# Altium PCB CH32H417QEU-R1.PcbDoc (part 6 of 6)
Units mil, origin at the board's own origin, x right, y up, seen from the top; angles counter-clockwise.
Board outline 4921.26 x 3346.46 mil, 4 copper layers (Top Layer, Layer 1, Layer 2, Bottom Layer), stack 23.756 mil thick; 271 components, 257 nets, 1065 pads, 927 vias.
Unrouted connection lines stored in the file: 149.
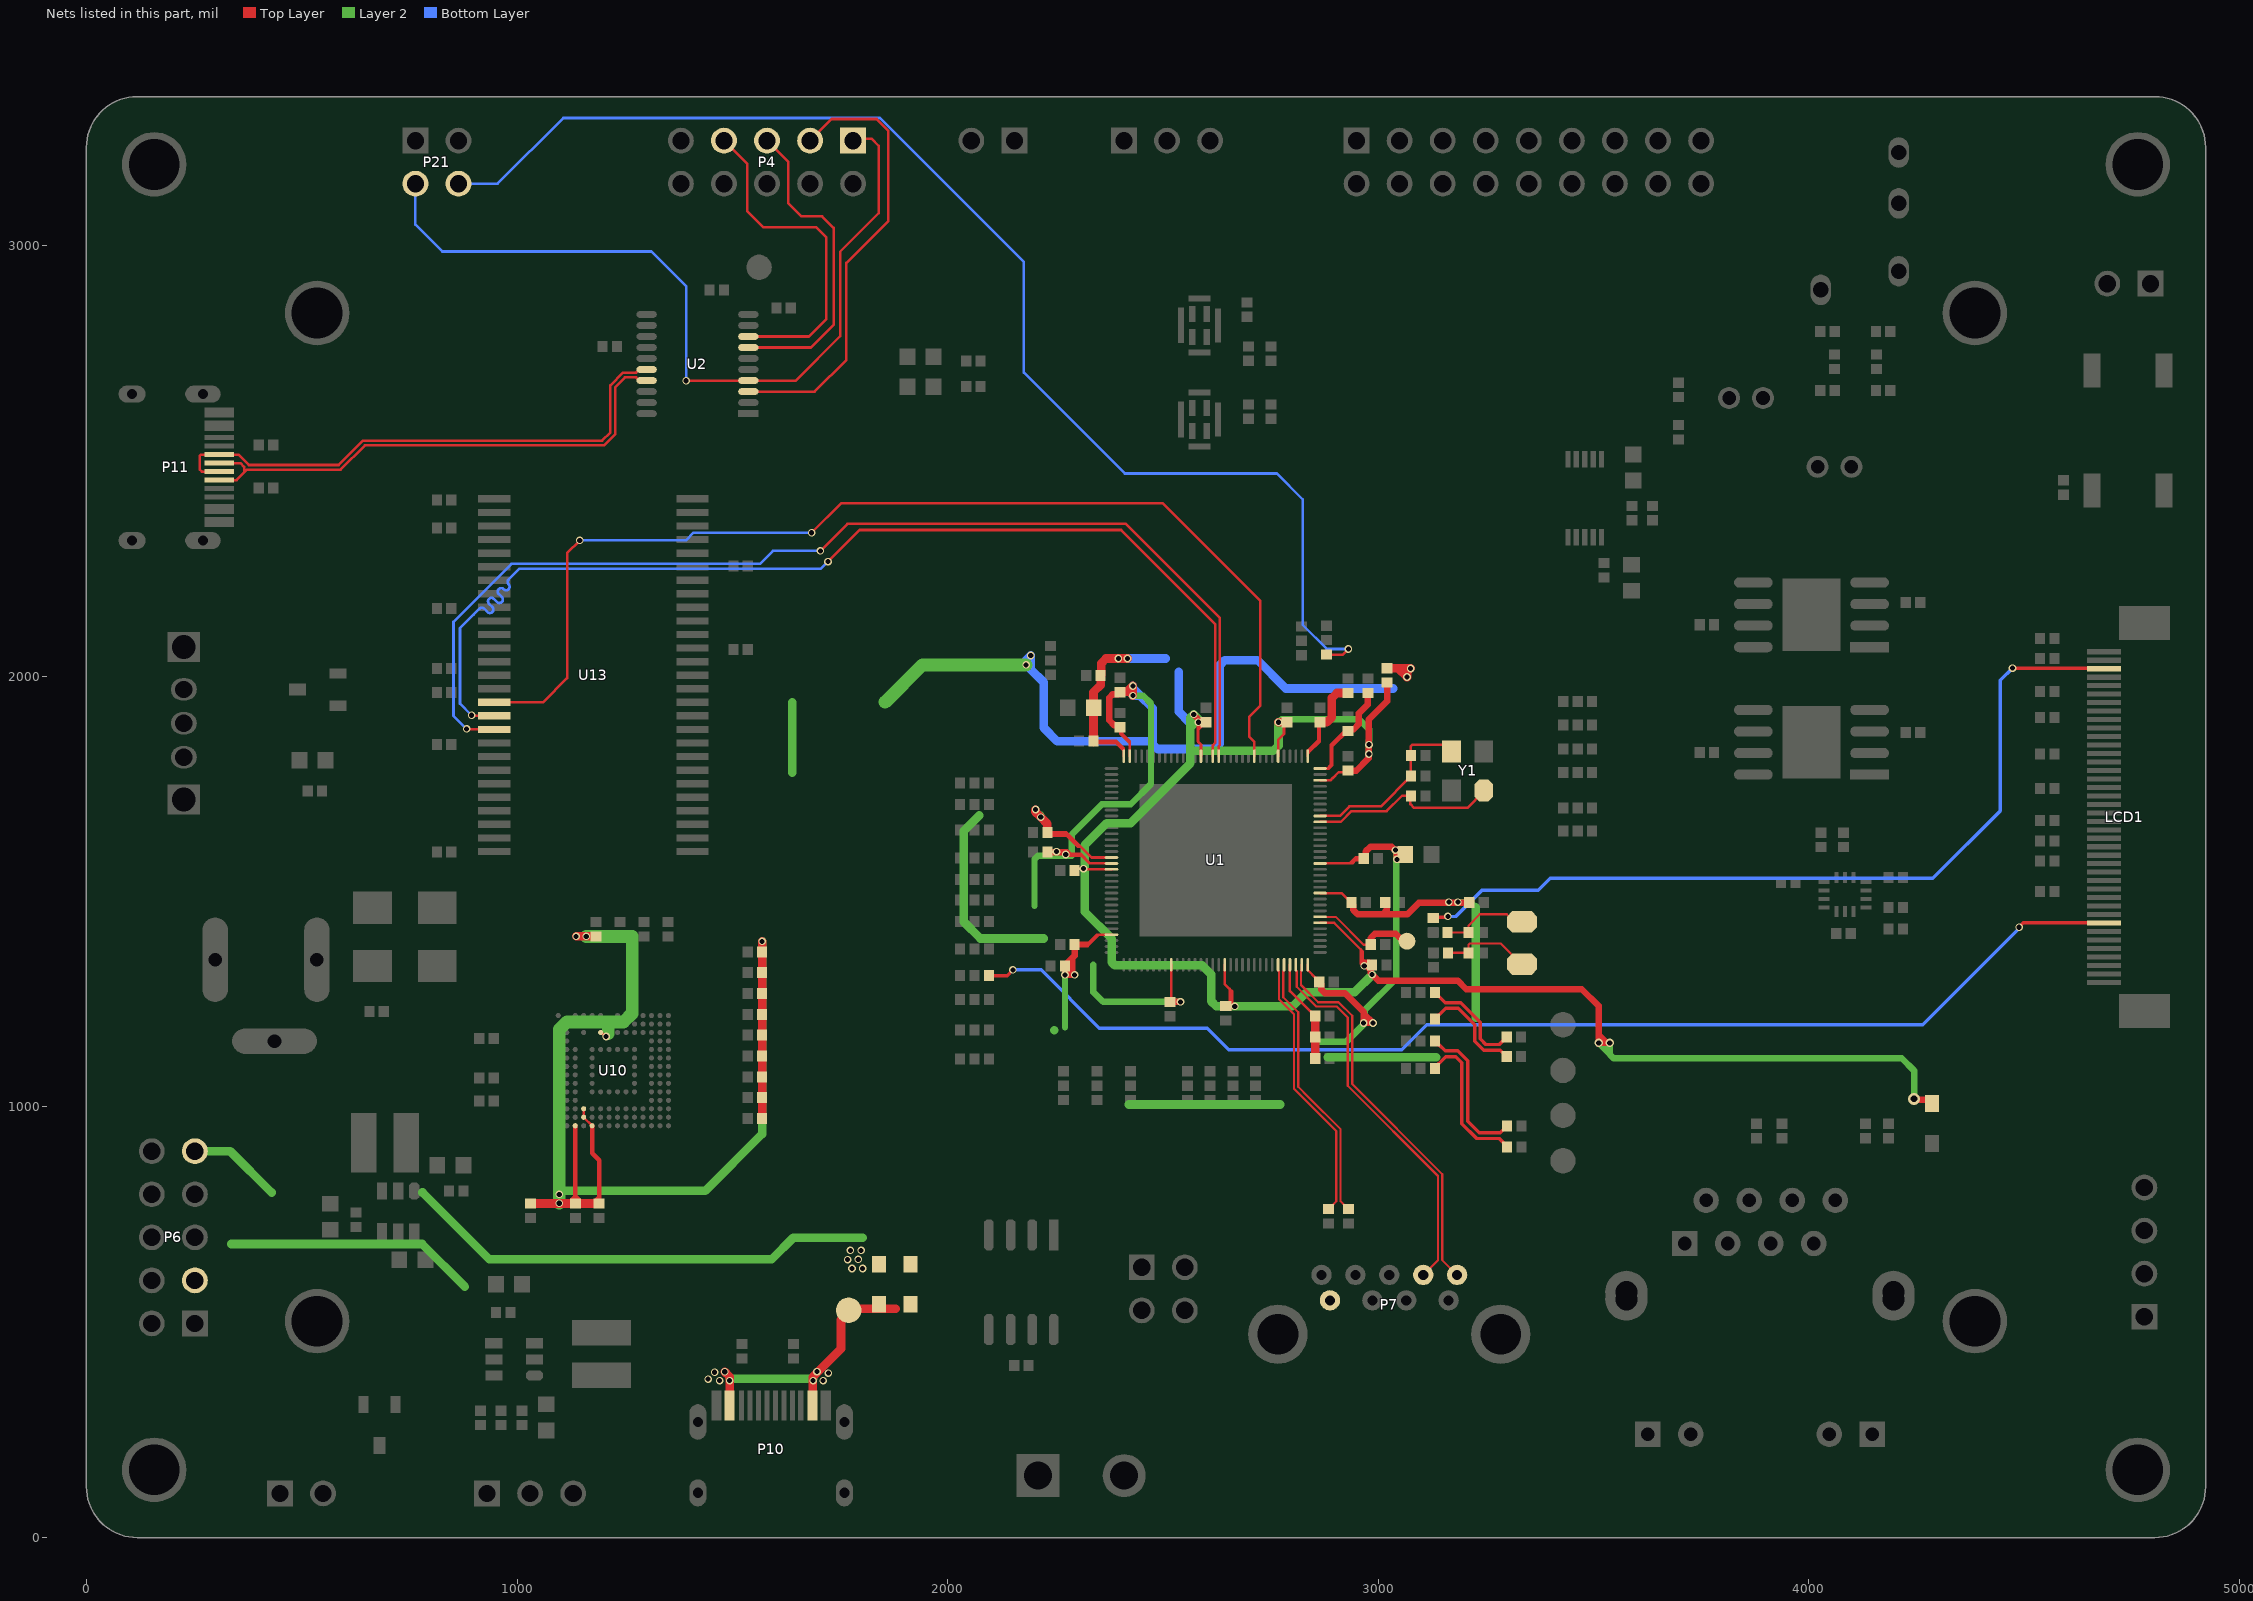
[diagram p8: the nets of this part, all layers, seen from the top]

## Via types
v1: diameter 17.72, hole 11.81, Top Layer to Bottom Layer, tented both sides, 558 vias
v2: diameter 19.68, hole 11.81, Top Layer to Bottom Layer, tented both sides, 320 vias
v3: diameter 28, hole 16, Top Layer to Bottom Layer, tented both sides, 24 vias
v4: diameter 20, hole 12, Top Layer to Bottom Layer, tented both sides, 22 vias
v5: diameter 27.56, hole 15.75, Top Layer to Bottom Layer, tented both sides, 3 vias

## Nets (pads, with @x,y where several pads share a name; then routed paths per layer and width w, separated by ;. In a path a pad name is that pad's centre, name@x,y a point inside that pad or via, vN(x,y) a via of type N, cw(c..) or ccw(c..) an arc to the next point about the centre after c; other vN are vias at no path point) (continued)
SDRAM_SDNCAS: U1.49 U13.17 | length 2611.6
  Top Layer w6: v1(894.5,1909.72) 895.22,1909 946.67,1909 U13.17@947.4,1908.28 ; v1(1722.05,2266.6) 1795.42,2339.97 2402.89,2339.97 2621.36,2121.5 2621.36,1845.52 2615.8,1839.97 U1.49@2615.8,1814.64
  Bottom Layer w6: v1(894.5,1909.72) 867.49,1936.73 867.49,2111.99 899.14,2143.64 912.58,2157.08 cw(c918.24,2151.42) 923.89,2157.08 931.39,2149.58 ccw(c937.04,2155.24) 942.7,2149.58 ccw(c937.04,2155.24) 942.7,2160.9 935.03,2168.56 cw(c940.69,2174.22) 935.04,2179.88 cw(c940.69,2174.22) 946.35,2179.88 953.49,2172.74 ccw(c959.14,2178.4) 964.8,2172.74 ccw(c959.14,2178.4) 964.8,2184.05 957.66,2191.19 cw(c963.32,2196.85) 957.66,2202.51 cw(c963.32,2196.85) 968.98,2202.51 969.15,2202.33 ccw(c974.81,2207.99) 980.46,2202.33 ccw(c974.81,2207.99) 980.46,2213.65 cw(c986.12,2219.3) 980.46,2224.96 995.14,2239.64 1005.75,2250.24 1705.69,2250.24 v1(1722.05,2266.6)
SDRAM_SDNRAS: U1.48 U13.18 | length 2613.4
  Top Layer w6: v1(882.94,1878.18) 883.64,1877.48 946.7,1877.48 U13.18@947.4,1876.78 ; v1(1704.51,2291.49) 1767.38,2354.36 2413.8,2354.36 2632.36,2135.8 2632.36,1840.97 2629.58,1838.19 U1.48@2629.58,1814.64
  Bottom Layer w6: v1(882.94,1878.18) 882.53,1878.18 852.52,1908.18 852.52,2126.76 987.01,2261.24 1563.93,2261.24 1594.17,2291.49 v1(1704.51,2291.49)
SDRAM_SDNWE: U1.42 U13.16 | length 2611.5
  Top Layer w6: U13.16@947.4,1939.77 1060.23,1939.77 1116.56,1996.11 1116.56,2286.61 v1(1145.76,2315.8) ; v1(1684.31,2333.53) 1753.13,2402.36 2499.29,2402.36 2726.39,2175.26 2726.39,1932.21 2700.25,1906.07 2700.25,1859.89 2712.26,1847.88 U1.42@2712.26,1814.64
  Bottom Layer w6: v1(1145.76,2315.8) 1392.35,2315.8 1410.34,2333.79 1684.04,2333.79 v1(1684.31,2333.53)
SERDES_RXN: C80.1 R61.1 | length 246.7
  Top Layer w8: R61.1@3131.65,1265.63 3131.65,1264.64 3139.46,1256.83 3140.44,1256.83 3155.33,1241.95 3191.31,1241.95 3236.72,1196.54 3236.72,1158.39 3249.99,1145.12 3280.66,1145.12 C80.1@3298.25,1162.71
SERDES_RXP: C79.1 R59.1 | length 247.1
  Top Layer w8: R59.1@3131.65,1203.86 3131.65,1204.84 3139.46,1212.65 3140.44,1212.65 3156.74,1228.95 3185.93,1228.95 3223.72,1191.15 3223.72,1153.01 3244.61,1132.12 3283.43,1132.12 C79.1@3298.25,1117.31 ; C79.1@3298.25,1116.81 C79.1@3298.25,1117.31 ; C79.1@3298.25,1117.8 C79.1@3298.25,1117.31
SERDES_TXN: C78.1 R57.1 | length 345.5
  Top Layer w8: R57.1@3131.65,1152.84 3139.46,1145.03 3140.44,1145.03 3155.33,1130.15 3185,1130.15 3207.32,1107.83 3207.32,966.79 3234.27,939.84 3283.61,939.84 3298.94,955.17 C78.1@3298.94,956.16
SERDES_TXP: C77.1 R55.1 | length 348.3
  Top Layer w8: R55.1@3131.65,1092.06 3131.65,1093.04 3139.46,1100.85 3140.44,1100.85 3156.74,1117.15 3179.62,1117.15 3194.32,1102.44 3194.32,961.4 3228.89,926.84 3280.69,926.84 3298.94,908.58 C77.1@3298.94,907.6
TDI: P4.7 U2.8 | length 782.8
  Top Layer w6: P4.7@1480.53,3244.09 1534.81,3189.82 1534.81,3079.8 1571.42,3043.18 1694.77,3043.18 1717.94,3020.01 1717.94,2829.21 1678,2789.27 1599.1,2789.27 U2.8@1537.16,2789.27
TDO: P4.5 U2.7 | length 739.2
  Top Layer w6: U2.7@1537.16,2763.67 1576.85,2763.67 1682.31,2763.67 1735.11,2816.47 1735.11,3041.38 1708.3,3068.2 1660.96,3068.2 1629.42,3099.73 1629.42,3195.2 P4.5@1580.53,3244.09
TOUCH_INT: LCD1.38 R3.1 | length 1976.2
  Top Layer w8: R3.1@3127.68,1438.79 3129.86,1440.97 3159.86,1440.97 v1(3161.72,1442.83) ; v1(4472.9,2019.14) 4473.61,2018.43 4684.3,2018.43 LCD1.38@4685,2017.73
  Bottom Layer w8: v1(3161.72,1442.83) 3162.14,1442.42 3179.93,1442.42 3240.83,1503.32 3371.7,1503.32 3399.36,1530.98 4287.94,1530.98 4444.35,1687.39 4444.35,1990.59 v1(4472.9,2019.14)
TOUCH_RST: LCD1.8 R25.1 | length 2794.8
  Top Layer w8: R25.1@2095.96,1305.04 2138.25,1305.04 v1(2151.53,1318.32) ; v1(4488.08,1417.44) 4498.05,1427.4 4684.78,1427.4 LCD1.8@4685,1427.18
  Bottom Layer w8: v1(2151.53,1318.32) 2216.98,1318.32 2352.13,1183.18 2602.52,1183.18 2653.03,1132.67 3054.21,1132.67 3112.92,1191.38 4264.09,1191.38 4488.08,1415.37 v1(4488.08,1417.44)
TX1: P21.4 R64.1 | length 3017.6
  Top Layer w6: R64.1@2879.81,2050.82 2879.96,2050.67 2917.75,2050.67 v1(2930.65,2063.57)
  Bottom Layer w6: P21.4@864.13,3144.09 954.9,3144.09 1107.42,3296.62 1842.37,3296.62 2176.96,2962.03 2176.96,2705.73 2411.59,2471.09 2764.41,2471.09 2824.62,2410.88 2824.62,2119.41 2880.46,2063.57 v1(2930.65,2063.57)
UART3_RX: P4.1 P21.3 U2.4 | length 1961.4
  Top Layer w6: v1(1392.57,2686.46) 1392.83,2686.72 1536.9,2686.72 U2.4@1537.16,2686.97 1647.37,2686.97 1750.59,2790.19 1750.59,2986.55 1840.04,3076 1840.04,3232.01 1823.37,3248.69 P4.1@1767.63,3248.69
  Bottom Layer w6: P21.3@764.13,3144.09 764.13,3049.25 826.76,2986.62 1312.09,2986.62 1392.57,2906.13 v1(1392.57,2686.46)
UART3_TX: P4.3 U2.3 | length 1048.7
  Top Layer w6: U2.3@1533.18,2661.03 1690.91,2661.03 1764.89,2735 1764.89,2959.91 1862.43,3057.45 1862.43,3266.85 1834.99,3294.28 1730.72,3294.28 P4.3@1680.53,3244.09
USB_N: P11.A7 P11.B7 U2.16 | length 1284.2
  Top Layer w6: P11.A7@308.88,2475.58 268.02,2475.58 262.81,2480.79 262.81,2511.44 266.33,2514.95 P11.B7@308.88,2514.95 353.23,2514.95 377.26,2490.93 585.62,2490.93 642.25,2547.56 1197.85,2547.56 1216.86,2566.56 1216.86,2675.88 1246.25,2705.27 1276.79,2705.27 1284.09,2712.57 U2.16@1300.92,2712.57
USB_P: P11.A6 P11.B6 U2.17 | length 1231.7
  Top Layer w6: P11.B6@308.88,2455.9 348.68,2455.9 366.39,2473.62 ; P11.A6@308.88,2495.27 357.36,2495.27 366.39,2486.23 366.39,2473.62 ; U2.17@1300.92,2686.97 1284.09,2686.97 1276.79,2694.27 1250.81,2694.27 1227.86,2671.32 1227.86,2562.01 1202.41,2536.56 646.81,2536.56 590.18,2479.93 372.7,2479.93 366.39,2473.62
USBSS_RXN: P7.6 U1.126 | length 899
  Top Layer w5.1: U1.126@2808.71,1330.38 2808.71,1317.46 2810.55,1315.62 2810.55,1278.99 2856.28,1233.25 2903.68,1233.25 2929.29,1207.64 2929.29,1049.22 3138.69,839.82 3138.69,644.38 P7.6@3104.37,610.06
USBSS_RXP: P7.5 U1.127 | length 899
  Top Layer w5.1: U1.127@2822.49,1330.38 2822.49,1317.46 2820.65,1315.62 2820.65,1283.17 2860.47,1243.35 2907.87,1243.35 2939.39,1211.83 2939.39,1053.4 3148.79,844.01 3148.79,644.38 P7.5@3183.11,610.06
USBSS_TXN: C45.2 U1.123 | length 631.3
  Top Layer w5.1: U1.123@2767.37,1330.38 2767.37,1317.46 2769.21,1315.62 2769.21,1250.64 2803.98,1215.87 2803.98,1042.79 2836.98,1009.79 2902.47,944.3 2902.47,781.03 2894.76,773.33 2894.76,772.35 2885.5,763.08 C45.2@2884.52,763.08
USBSS_TXP: C44.2 U1.124 | length 631.3
  Top Layer w5.1: U1.124@2781.15,1330.38 2781.15,1317.46 2779.31,1315.62 2779.31,1254.82 2814.08,1220.06 2814.08,1046.98 2837.01,1024.05 2912.57,948.49 2912.57,781.03 2920.27,773.33 2920.27,772.35 2929.53,763.08 C44.2@2930.52,763.08
VBAT: C23.2 U1.7 VBAT1.1 | length 253.4
  Top Layer w5: U1.7@2864.81,1441.6 2901.15,1441.6 2965.91,1376.84 C23.2@2982.6,1376.84
  Top Layer w15: C23.2@2982.6,1376.84 2982.6,1392.38 2992.36,1402.14 3040.6,1402.14 VBAT1.1@3062.67,1380.08
VBUS_5V: P6.3 P7.1 | length 583.9
  Layer 2 w20: 336.27,681.81 779.58,681.81 879.02,582.37
VBUS_CC: D4.2 D5.2 IAP2.1 P10.A4 P10.B4 | length 640.6
  Top Layer w20: v1(1482.38,385.25) 1493.62,374.01 P10.A4@1493.62,306.76 ; P10.B4@1686.54,306.76 1686.54,372.71 1752.25,438.42 1752.25,505.53 1778,531.28 1879.66,531.28
  Layer 2 w20: v1@1494.41,369.24 v1@1687.81,369.24
  other v1: 1470.67,364.64 1493.81,364.64 1687.81,364.55 1710.89,364.55 1443.73,368.11 1722.93,382.04 1459.02,384.1 1696.58,385.33
VBUS_FS: D4.1 D5.1 P6.9 | length 1324.7
  Layer 2 w20: P6.9@251.84,897.38 334.12,897.38 430.1,801.4 ; 780.62,801.4 935.22,646.81 1591.95,646.81 1641.33,696.18 1802.8,696.18
  other v1: 1777.97,624.97 1802.59,624.97 1767.71,645.52 1792.33,646.03 1774.12,666.93 1799.26,666.93
VDD33: C1.1 C16.2 C26.2 C27.2 R35.1 U1.16 U1.93 U1.128 | length 1606.6
  Top Layer w6: C1.1@2294.3,1380.06 2295.29,1381.05 2327.3,1381.05 ; C1.1@2294.81,1377.05 2323.3,1377.05 2327.3,1381.05 ; C1.1@2301.61,1371.29 2303.62,1373.3 2325,1373.3 2351.97,1400.27 ; U1.93@2380.56,1400.27 2351.97,1400.27 ; U1.128@2836.27,1330.38 2836.27,1317.79 2854.15,1299.9 2854.15,1298.65 C16.2@2862.96,1289.84 ; U1.16@2864.81,1565.62 2933.46,1565.62 ; C27.2@2957.86,1573.77 2957.35,1573.25 2947.7,1573.25 2940.07,1565.62 2933.46,1565.62 ; C27.2@2964.61,1576.07 2950.51,1576.07 2947.21,1579.37 ; C27.2@2966.16,1579.37 2947.21,1579.37 ; 2327.3,1381.05 2346.51,1400.27 2351.97,1400.27 ; 2933.46,1565.62 2947.21,1579.37
  Top Layer w15: v1(2272.49,1306.68) v1(2272.49,1306.68) 2272.53,1327.77 R35.1@2272.57,1327.8 ; v1@2275.38,1306.68 v1@2289,1306.68 ; 2288.79,1344.54 2289,1344.34 v1@2289,1310.39 ; v1(2294.75,1306.68) v1@2289,1306.68 ; C1.1@2294.81,1377.05 2294.81,1351.04 2272.57,1328.79 R35.1@2272.57,1327.8 ; C16.2@2862.96,1289.84 2867.28,1285.53 2867.28,1272.77 2875.49,1264.55 2922.21,1264.55 2966.18,1220.59 2966.18,1216.62 ; C27.2@2966.16,1579.37 2967.18,1579.37 2970.47,1582.67 2970.47,1593.16 2981.98,1604.67 3030.8,1604.67 3038.82,1596.65 v1(3039.55,1596.65) ; v1(3043.5,1574.96) 3042.98,1575.48 3042.98,1592.49 3039.55,1595.91 v1(3039.55,1596.65) ; C26.2@3054.92,1577.37 3050.61,1581.68 3050.61,1585.59 v1(3039.55,1596.65) ; C26.2@3055.42,1597.51 3055.08,1597.17 3040.07,1597.17 v1(3039.55,1596.65) ; R35.1@2272.57,1327.8 2272.57,1326.82 v1@2289,1310.39 ; v1@2289,1306.68 v1@2289,1310.39 ; 2966.18,1216.62 v1(2987.69,1195.11) v1(2966.18,1195.11) 2966.18,1216.62
  Layer 2 w15: 2272.49,1185.62 v1(2272.49,1306.68) ; 2858.84,1151.17 2925.23,1151.17 2969.18,1195.11 2969.18,1225.72 3041.55,1298.09 v1@3041.55,1589.3
VDD33A: C15.2 R39.1 U1.33 | length 296.6
  Top Layer w6: U1.33@2836.27,1814.64 2836.37,1814.73 2836.37,1827.33 2861.05,1852.02 ; U1.33@2838.2,1823.09 2864.18,1849.08 2864.18,1855.15 ; C15.2@2861.64,1895.46 2861.05,1894.87 2861.05,1852.02 ; C15.2@2864.18,1893.55 2864.18,1855.15 ; 2861.05,1852.02 2864.18,1855.15
  Top Layer w20: C15.2@2864.18,1893.55 2880.69,1893.55 2892.4,1905.26 2892.4,1949.79 2904.12,1961.5 R39.1@2929.62,1961.5
VDD_1.2A: C13.2 C14.2 R27.1 U1.125 | length 243.2
  Top Layer w6: U1.125@2794.93,1330.38 2794.93,1269.33 2843.7,1220.56 2844.69,1220.56 C14.2@2853.5,1211.75 ; C14.2@2853.5,1211.75 C14.2@2853.5,1210.76 C14.2@2853.5,1211.75
  Top Layer w20: R27.1@2853.5,1113.02 C13.2@2853.5,1162.17 C14.2@2853.5,1210.76
VDDIO: C2.1 C5.2 C6.1 C10.1 C11.2 C12.2 C22.2 C28.1 D10.1 R31.1 R33.2 U1.6 U1.30 U1.38 U1.51 U1.64 U1.82 U1.114 | length 5529.8
  Top Layer w6: C2.1@2294.81,1549.28 2299.11,1553.58 v1(2315.63,1553.58) 2317.31,1551.9 2380.51,1551.9 U1.82@2380.56,1551.84 ; C6.1@2338.7,1840.63 2342.46,1844.38 2391.96,1844.38 U1.64@2409.11,1827.24 ; C6.1@2338.75,1849.89 2391.91,1849.89 2409.11,1832.69 U1.64@2409.11,1827.24 ; U1.64@2409.11,1814.64 U1.64@2409.11,1827.24 ; U1.114@2643.36,1330.38 2643.36,1285.79 2655.06,1274.09 ; v1@2661.98,1237.97 2660.3,1239.65 2660.3,1268.85 2655.06,1274.09 ; v1(2666.64,1233.59) 2653.63,1233.59 2655.06,1235.02 2655.06,1274.09 ; U1.38@2767.37,1814.64 2767.37,1852.66 2781.15,1866.43 2781.15,1886.77 C12.2@2787.93,1893.55 ; U1.6@2864.81,1427.83 2897.68,1427.83 2959.2,1366.3 ; U1.30@2864.81,1758.53 2888.65,1758.53 2894.21,1764.09 2894.71,1764.09 2908.24,1777.63 2916.02,1777.63 ; v1@2965.81,1327.78 2965.19,1328.4 v1@2965.19,1329.25 ; v1(2967.43,1327.69) 2967.43,1326.75 v1@2980.37,1313.81 ; v1@2969.28,1332.3 2968.22,1332.3 2965.99,1332.3 v1@2965.19,1333.11 ; C22.2@2977.56,1330.19 2977.56,1337.25 2976.79,1338.02 2965.19,1338.02 ; C22.2@2982.6,1329.25 2971.26,1329.25 v1@2965.19,1329.25 ; C22.2@2983.89,1335.46 2980.3,1339.05 2967.8,1339.05 2963.55,1343.3 ; 2959.2,1366.3 2962.79,1362.72 2962.79,1360.74 2963.55,1359.98 2963.55,1343.3 ; 2959.2,1366.3 2959.2,1333.32 2963.27,1329.25 v1@2965.19,1329.25 ; 2963.55,1338.02 2965.19,1338.02 ; 2963.55,1338.02 2963.55,1340.79 ; 2963.55,1338.02 2965.19,1336.39 ; 2963.55,1340.79 2963.55,1343.3 ; 2963.55,1340.79 2965.19,1339.16 2965.19,1338.02 ; v1@2965.19,1329.25 v1@2965.19,1333.11 ; v1@2965.19,1333.11 2965.19,1335.33 2965.19,1336.39 ; 2965.19,1336.39 2965.19,1338.02
  Top Layer w7: v1@2580.8,1900.44 2581.45,1899.79 2581.45,1876.16 ; v1(2582.23,1893.55) v1@2584.81,1893.55 ; v1@2582.41,1888.72 2584.16,1888.72 2584.28,1888.6 2584.28,1884.37 2586.97,1881.68 ; v1@2583.35,1892.09 v1@2584.81,1893.55 ; U1.51@2588.24,1814.64 2588.24,1841.54 2581.45,1848.33 2581.45,1876.16 ; C10.1@2599.81,1893.55 C10.1@2598.83,1893.55 ; 2581.45,1876.16 2586.97,1881.68 ; v1@2584.81,1893.55 C10.1@2598.83,1893.55 ; 2586.97,1881.68 C10.1@2598.83,1893.55
  Top Layer w15: v1(2571.5,1911.69) 2571.5,1910.96 2581.71,1900.75 2581.71,1894.23 v1@2582.12,1893.81 ; C28.1@2929.59,1781.1 2949.12,1781.1 2977.56,1809.53 2977.56,1819.24 v1(2978.08,1819.76) 2978.08,1899.82 3020.39,1942.13 R33.2@3020.39,1985.47 ; 2964.46,1336.06 2965.19,1335.33 2968.22,1332.3 v1@2971.26,1329.25 ; v1@2982.6,1311.21 2982.6,1329.25 C22.2@2985.6,1329.25 ; v1@2987.44,1306.37 3000.21,1293.61 3184.51,1293.61 3204.51,1273.61 3472.82,1273.61 3511.5,1234.93 3511.5,1167.06 ; v2@3511.48,1147.22 3512.93,1148.67 v2(3537.47,1148.67) ; v2@3511.5,1149.37 3511.5,1167.06 ; v2@3537.86,1149.64 3537.77,1149.56 3535.3,1149.56 3535.22,1149.64 3528.91,1149.64 3511.5,1167.06 ; v5(4244.17,1018.9) 4246.57,1016.5 4277.64,1016.5 D10.1@4285.54,1008.6
  Top Layer w20: C6.1@2338.75,1849.89 2338.75,1963.48 2355.33,1980.05 R31.1@2355.33,2001.48 2357.14,2003.29 2357.14,2030.72 2367.8,2041.38 v1(2396.39,2041.38) v1(2417.73,2041.38) ; C11.2@2643.54,1234.73 2644.69,1233.59 C11.2@2653.63,1233.59 ; v1(2768.21,1893.55) C12.2@2787.93,1893.55
  Layer 2 w15: v1(2768.21,1893.55) 2768.95,1893.55 2775.48,1900.08 2955.99,1900.08 2978.67,1877.4 2978.67,1851.08 2978.08,1850.49 v1(2978.08,1819.76) ; v5(4244.17,1018.9) 4244.17,1084.5 4215.34,1113.33 3546.25,1113.33 3537.47,1122.12 3537.47,1123.21 ; 3524.74,1135.94 v2(3512.01,1148.67) v2(3537.47,1148.67) ; 3524.74,1135.94 3537.47,1123.21 ; 3524.74,1135.94 v2(3537.47,1148.67) ; 3537.47,1123.21 v2(3537.47,1148.67)
  Layer 2 w20: v1(2768.21,1893.55) 2768.21,1839.4 2756.5,1827.69 2563.61,1827.69 ; v1(2985.76,1307.32) 2945.21,1266.78 2833.81,1266.78 2800.62,1233.59 v1(2666.64,1233.59) 2624.06,1233.59 2612.34,1245.3 2612.34,1307.77 2591.37,1328.75 2388.01,1328.75 2380.87,1335.89 2380.87,1391.05 2318.05,1453.88 2318.05,1608.08 2369.15,1659.17 2424.91,1659.17 2563.61,1797.88 2563.61,1827.69 ; 2563.61,1827.69 2563.61,1881.83 ; 2563.61,1881.83 2575.33,1893.55 v1(2582.23,1893.55) 2582.23,1900.97 v1(2571.5,1911.69) 2563.61,1903.81 2563.61,1881.83
  Bottom Layer w20: v1(2396.39,2041.38) v1(2417.73,2041.38) 2505.81,2041.38 ; 2536.98,2010.21 2536.98,1917.69 2561.13,1893.55 v1(2582.23,1893.55)
  other v1: 2978.44,1841.53
VDDK: C4.1 C24.2 C25.1 R29.1 U1.11 U1.80 | length 2174.1
  Top Layer w6: C4.1@2231.41,1637.91 2275.67,1637.91 2278.8,1634.78 ; C4.1@2233.74,1634.78 2278.8,1634.78 ; C4.1@2241.42,1629.44 2277.4,1629.44 2301.85,1605 2308.58,1605 ; 2329.27,1584.31 2308.58,1605 ; U1.80@2380.56,1579.4 2334.18,1579.4 2308.58,1605 ; U1.11@2864.81,1496.72 2915.02,1496.72 2937.58,1474.16 C25.1@2937.58,1473.18 ; 2278.8,1634.78 2308.58,1605
  Top Layer w15: C25.1@2937.58,1473.18 2941.89,1468.87 2941.89,1457.61 2951.94,1447.56 3010.51,1447.56 ; C24.2@3019.29,1473.18 3019.29,1456.34 3010.51,1447.56 ; R29.1@3211.48,1474.17 3094.47,1474.17 3067.85,1447.56 3010.51,1447.56
  Top Layer w20: v1@2203.64,1690.68 2203.64,1685.78 v1(2216.14,1673.28) 2231.57,1657.84 C4.1@2231.57,1637.93
  Layer 2 w15: v1(3184.87,1475.61) 3214.94,1475.61 3226.54,1464.02
  Layer 2 w20: 2073.5,1676.89 2037.47,1640.85 2037.47,1430.18 2076.37,1391.28 2222.54,1391.28 ; v1@2214.53,1676.89 v1@2215.14,1676.28 ; 2247.63,1178.65 2247.71,1178.58 ; 2420.59,1005.69 2772.74,1005.69 ; 2882.99,1115.94 3134.67,1115.94 ; 3226.54,1207.81 3226.54,1464.02
  other v1: 3163.85,1475.61 2204.24,1690.75
VIO_1.8: C3.1 C7.1 C8.2 C9.1 C52.2 C53.1 C54.1 C55.1 R33.1 R97.2 R98.2 R99.2 R100.2 R101.2 R102.2 R103.2 R104.2 R105.2 U1.63 U1.81 U1.105 U10.C6 U10.M4 U10.N4 U10.P3 U10.P5 | length 6841.4
  Top Layer w6: U10.M4@1154.83,995.85 U10.N4@1154.83,976.16 U10.P5@1174.52,956.48 ; U10.C6@1194.2,1173.01 1195.77,1173.01 1204.94,1163.84 v1(1206.82,1163.84) ; C3.1@2230.54,1588.6 2232.7,1586.45 v1@2271.83,1586.45 ; C3.1@2231.57,1591.87 2266.41,1591.87 v1@2271.83,1586.45 ; C3.1@2237.34,1596.39 2268.45,1596.39 ; v1(2274.34,1586.45) v1@2271.83,1586.45 ; 2285.81,1587.62 2284.98,1588.45 ; U1.81@2380.56,1565.62 2330.97,1565.62 ; C7.1@2400.44,1881.77 2400.44,1866.99 2422.89,1844.54 2422.89,1833.48 ; C7.1@2407.12,1877.65 2405.58,1876.11 2405.58,1866.74 2422.89,1849.43 2422.89,1833.48 ; U1.63@2422.89,1814.64 2422.89,1833.48 ; U1.105@2519.34,1330.38 2519.34,1248 C9.1@2523.08,1244.27 ; 2268.45,1596.39 2276.39,1588.45 2284.98,1588.45 ; 2268.45,1596.39 2277.04,1596.39 2284.98,1588.45 ; v1@2271.83,1586.45 2274.38,1583.9 2310.57,1583.9 2328.85,1565.62 2330.97,1565.62 ; 2284.98,1588.45 2308.13,1588.45 2330.97,1565.62
  Top Layer w10: C53.1@1126.47,779.14 1126.47,784.05 1135.46,793.04 ; U10.P3@1135.15,956.48 1135.46,956.16 1135.46,793.04 ; C53.1@1135.78,775.85 1135.46,776.16 1135.46,793.04 ; C53.1@1145.92,782.58 1135.46,793.04 ; U10.P5@1174.52,956.48 1174.52,892.6 1190.78,876.34 1190.78,790.94 ; C54.1@1179.48,779.65 1190.78,790.94 ; C54.1@1190.78,775.85 1190.78,790.94 ; 1190.78,797.9 1190.78,790.94
  Top Layer w15: C7.1@2400.44,1881.77 2396.13,1886.08 2387.31,1886.08 2375.15,1898.25 2375.15,1950.08 2383.93,1958.87 2396.13,1958.87 C8.2@2400.44,1963.18 ; C9.1@2515.86,1244.02 2515.98,1244.15 2540.57,1244.15 v1(2540.69,1244.27)
  Top Layer w20: C52.2@1030.78,775.85 1097.51,775.85 v1(1098.05,776.38) 1098.59,775.85 C53.1@1135.78,775.85 C54.1@1190.78,775.85 ; v1(1137.24,1396.17) 1137.36,1396.29 C55.1@1183.89,1396.29 1183.77,1396.17 v1(1160.85,1396.17) ; R105.2@1569.1,973.26 R100.2@1569.1,1021.62 R102.2@1569.1,1069.99 R103.2@1569.1,1118.35 R99.2@1569.1,1166.71 R101.2@1569.1,1215.07 R98.2@1569.1,1263.44 R97.2@1569.1,1311.8 R104.2@1569.1,1360.16 v1(1569.1,1384.72) ; C8.2@2400.44,1963.18 2401.44,1964.18 2416.66,1964.18 ; v1(2430.02,1955.18) v1@2430.02,1963.18 ; R33.1@3020.39,2018.93 3046.32,2018.93 ; v1(3075.15,2018.43) 3066.82,2010.1 v1(3066.82,1998.43) 3046.32,2018.93 ; v1@3075.15,2018.93 3046.32,2018.93 ; 2416.66,1964.18 v1(2430.02,1977.54) v1@2430.02,1963.18 ; 2416.66,1964.18 2429.02,1964.18 v1@2430.02,1963.18
  Layer 2 w15: 2201.67,1467.36 2201.67,1575.11 2210.45,1583.9 2288.04,1583.9 2288.04,1632.63 2358.36,1702.96 2425.02,1702.96 2472.19,1750.13 2472.19,1937.04 2454.05,1955.18 v1(2430.02,1955.18) ; 2338.62,1330.4 2338.62,1266.66 2361.02,1244.27 v1(2540.69,1244.27)
  Layer 2 w20: v1@1098.07,805.58 1437.43,805.58 1569.1,937.26 v1(1569.1,1384.72) ; 1639.22,1776.12 1639.22,1940.11
  Layer 2 w30: v1(1098.05,776.38) 1098.07,805.58 1098.07,1179.72 1115.64,1197.29 1247.5,1197.29 1267.6,1217.39 1267.6,1396.17 v1(1160.85,1396.17) ; v1@1211.8,1170.01 1211.8,1191.35 ; 1854.92,1940.11 1941.64,2026.83 v1(2182.44,2026.83)
  Bottom Layer w20: v1(2430.02,1977.54) v1@2430.02,1972.24 ; 3034.92,1971.84 2785.35,1971.84 2719.41,2037.77 2643.52,2037.77 2631.8,2026.06 2631.8,1843.17 2620.09,1831.45 2487.57,1831.45 2475.85,1843.17 2475.85,1849.21 ; 2193.07,2016.2 v1(2193.07,2048.6) 2182.44,2037.97 v1(2182.44,2026.83) 2193.07,2016.2 ; 2193.07,2016.2 2222.93,1986.35 2222.93,1880.43 2254.14,1849.21 2475.85,1849.21 ; v1@2430.02,1972.24 2447.08,1955.18 ; v1@2430.02,1972.24 v1(2430.02,1955.18) 2447.08,1955.18 ; 2447.08,1955.18 2475.85,1926.41 2475.85,1849.21
  other v1: 1098.05,797.1 2252.81,1592.99
VREF: C29.2 R37.1 U1.32 | length 342.9
  Top Layer w6: U1.32@2864.81,1786.09 2881.61,1786.09 ; C29.2@2919.67,1870.77 2889.54,1840.64 2889.54,1794.03 2881.61,1786.09 ; C29.2@2931.59,1875.79 2892.88,1837.08 2892.88,1793.38 2885.59,1786.09 2881.61,1786.09
  Top Layer w15: C29.2@2929.62,1872.83 2933.93,1877.14 2942.75,1877.14 2954.91,1889.3 2954.91,1913.86 2975.66,1934.6 R37.1@2975.66,1961.5
X32KI: C18.1 R2.1 Y2.1 | length 212
  Top Layer w5: R2.1@3161.86,1358.03 3200.06,1358.03 3202.43,1358.03 C18.1@3209.37,1358.03 3209.37,1376.91 3212.3,1379.84 3284.08,1379.84 3332.32,1331.6 Y2.1@3333.77,1331.6
X32KO: C21.1 R4.1 Y2.2 | length 217.5
  Top Layer w5: R4.1@3161.14,1405.33 C21.1@3209.37,1405.33 3209.37,1421.22 3235.75,1447.6 3298.34,1447.6 3315.92,1430.03 Y2.2@3333.77,1430.03 ; Y2.2@3325.75,1426.15 Y2.2@3333.37,1418.52
XI: C17.2 U1.23 Y1.1 | length 443.2
  Top Layer w6: U1.23@2864.81,1662.08 2912.87,1662.08 2937.78,1686.98 3019.46,1686.98 3055.26,1722.78 3068.93,1722.78 3074.31,1717.4 3074.31,1703.63 3083.19,1694.76 3206.97,1694.76 3244.82,1732.61 Y1.1@3244.82,1735.3
XO: C20.2 R78.2 U1.24 Y1.3 | length 421.1
  Top Layer w6: U1.24@2864.81,1675.86 2911.1,1675.86 2933.22,1697.98 3006.21,1697.98 3075.27,1767.04 C20.2@3075.27,1768.26 ; C20.2@3075.88,1768.63 R78.2@3075.88,1816.07 3075.88,1838.15 3079.39,1841.66 3154.21,1841.66 Y1.3@3170.02,1825.85
pads on no net: ?.0 LCD1.0 P10.A8 P10.B8 P11.A8 P11.B8 P12.17 P13. P13.7 S4.0 S4.3 U2.2 U2.5 U3.1 U3.5 U4.1 U10.A1 U10.A8 U10.A9 U10.A10 U10.A11 U10.A12 U10.A13 U10.A14 U10.B8 U10.B9 U10.B10 U10.B11 U10.B12 U10.B13 U10.B14 U10.C8 U10.C9 U10.C10 U10.C11 U10.C12 U10.C13 U10.C14 U10.D1 U10.D2 U10.D12 U10.D13 U10.D14 U10.E1 U10.E2 U10.E3 U10.E5 U10.E8 U10.E9 U10.E10 U10.E12 U10.E13 U10.E14 U10.F1 U10.F2 U10.F3 U10.F10 U10.F12 U10.F13 U10.F14 U10.G1 U10.G2 U10.G3 U10.G10 U10.G12 U10.G13 U10.G14 U10.H1 U10.H2 U10.H3 U10.H12 U10.H13 U10.H14 U10.J1 U10.J2 U10.J3 U10.J12 U10.J13 U10.J14 U10.K1 U10.K2 U10.K3 U10.K6 U10.K7 U10.K10 U10.K12 U10.K13 U10.K14 U10.L1 U10.L2 U10.L3 U10.L12 U10.L13 U10.L14 U10.M1 U10.M2 U10.M3 U10.M7 U10.M8 U10.M9 U10.M10 U10.M11 U10.M12 U10.M13 U10.M14 U10.N3 U10.N6 U10.N7 U10.N8 U10.N9 U10.N10 U10.N11 U10.N12 U10.N13 U10.N14 U10.P1 U10.P2 U10.P7 U10.P8 U10.P9 U10.P10 U10.P11 U10.P12 U10.P13 U10.P14 U11.2 U11.3 U11.4 U11.9 U11.10 U11.11 U13.40 U14.5

## Polygon pours and split planes (outlines as drawn)
GND on Top Layer "GND-L1" (solid, remove dead copper, pour order 26): -1.37,3341.25 -1.37,5.04 4917.26,5.04 4917.26,3353.71
5V on Top Layer "5V" (solid, remove dead copper, pour order 5): 637.89,501.01 658.73,480.18 861.62,480.18 877.82,463.98 877.82,448.43 892.57,433.68 960.73,433.68 964.72,437.67 963.77,438.62 963.77,601.39 956.36,608.8 896.06,608.8 883.84,596.58 884.83,556.02 871.97,543.16 706.58,543.16 696.38,553.36 696.38,728.75 693.98,731.15 539.59,731.15 531.46,739.28 531.46,999.1 529.51,1001.05 471.02,1001.05 468.32,996.65 468.32,660.47 499.12,629.67 632.19,629.67 637.89,623.96
NetS4_2 on Top Layer "NetF1_2" (solid, remove dead copper, pour order 3): 194.76,1940.92 307.32,1940.92 356.04,1892.21 510.23,1892.21 517.8,1899.77 517.8,2002.7 510.52,2009.98 340.43,2009.98 194.47,2009.98 188.52,2004.03 188.52,1946.29
NetP6_2 on Top Layer "NetP6_2" (solid, remove dead copper, pour order 1): 164.92,944.95 190.66,919.21 190.66,475.52 179.44,464.3 76.9,464.3 63.69,477.51 63.69,1913.75 78.58,1928.64 254.18,1928.64 259.69,1923.13 259.69,1864.6 255.15,1860.84 176.33,1860.84 164.92,1849.43
DC_5V on Top Layer "DC_5V" (solid, remove dead copper, pour order 2): 512.62,1262.04 502.3,1272.36 502.3,1364.38 508,1370.08 792.48,1370.08 806.3,1356.26 806.3,1043.35 788.74,1025.8 449.58,1025.8 443.36,1019.58 443.36,773.5 425.75,755.89 223.96,755.89 219.44,759.44 219.44,835.22 221.91,837.69 317.12,837.69 319.75,840.32 319.75,1101.85 324.79,1106.89 674.06,1106.89 680.31,1113.14 680.31,1256.53 674.8,1262.04
GND on Layer 2 "GND-L3" (solid, remove dead copper, pour order 27): -1.08,3349.62 -1.08,-0.15 4918.18,-0.15 4918.18,3340.35
5V on Layer 2 "5V" (solid, remove dead copper, pour order 4): 1043.44,2809.55 1047.85,2813.96 1047.85,3008.99 1053.24,3015.28 1339.44,3015.28 1343.25,3019.09 1343.25,3170.46 1351.27,3178.48 1408.16,3178.48 1416.37,3170.27 1416.37,2960.03 1408.31,2951.96 1151.41,2951.96 1146.15,2948.01 1146.15,2705.14 1136.43,2695.41 913.68,2695.41 908.77,2690.51 908.77,2358.24 743.14,2192.61 743.14,1011.61 736.37,1004.84 606.89,1004.84 601.87,999.83 602.12,999.58 602.12,941.74 595.46,935.08 457.45,935.08 451.6,940.93 451.6,1091.53 458.08,1098.01 585.5,1098.01 601.96,1114.47 601.96,2179.35 800.46,2377.85 800.46,2808.63 801.37,2809.55
3V3 on Layer 2 "3V3" (solid, remove dead copper, pour order 10): 2268.32,1990.45 2271.16,1987.61 2308.58,1987.61 2314.07,1982.12 2314.07,1944.7 2202.88,1833.52 2008.85,1833.52 1994.03,1818.7 1994.03,1315.12 2013.61,1295.54 2186.85,1295.54 2192.56,1301.24 2192.56,1341.76 2213.52,1362.72 2244.04,1362.72 2247.82,1358.93 2247.82,1335.62 2230.63,1318.42 2230.62,1261.77 2209.27,1240.42 1931.58,1240.42 1916.4,1255.59 1916.4,1868.72 2020.13,1972.44 2200.57,1972.44 2210.82,1981.78 2210.82,2167.91 2202.61,2175.62 939.77,2175.62 929.94,2165.79 929.94,1660.81 958.77,1631.97 1415.69,1631.97 1420.14,1627.52 1420.14,1037.06 1389.35,1006.28 1245.57,1006.28 1237.19,1011.49 1237.19,1088.67 1242.38,1093.86 1283.74,1093.86 1318.69,1128.81 1318.69,1443.84 1294.81,1467.72 774.29,1467.72 764.01,1478 764.01,2191.54 920.73,2348.26 1436.11,2348.26 1446.89,2359.04 1446.89,3172.54 1456.05,3181.71 1510.41,3181.71 1520.19,3171.93 1520.19,2986.1 1536.48,2969.81 2339.11,2969.81 2345.75,2976.45 2345.75,2989.99 2346.07,3173.41 2346.07,3176 2351.26,3181.2 2780.53,3181.2 2782.65,3182.69 2782.65,3272.16 2785.12,3274.64 2978.91,3274.64 2983.51,3270.04 2983.51,3210.98 2981.39,3208.86 2903.59,3208.86 2896.6,3201.87 2896.6,3154.78 2928.5,3122.49 2928.5,2922.52 3003.49,2847.52 3003.49,2618.4 3011.5,2610.4 3383.9,2610.4 3389.23,2605.06 3389.23,2514.36 3386.03,2511.16 2729.79,2511.16 2714.86,2526.1 2714.86,2610.4 2721.26,2616.8 2854.64,2616.8 2867.53,2629.69 2867.53,2845.67 2828.27,2884.93 2828.27,3029.61 2783.49,3074.4 2493.71,3074.4 2457.38,3038.07 2457.38,2319.93 2268.32,2130.88
Link_5V on Layer 2 "Link_5V" (solid, remove dead copper, pour order 12): 474.58,2356.59 474.58,2617.72 471.63,2620.68 338.66,2620.68 327.75,2609.77 327.75,2160.74 310.53,2142.56 310.53,1645.24 285.8,1620.5 118.17,1620.5 101.63,1603.97 101.63,1009.8 106.62,1004.81 290.41,1004.81 296.83,1011.24 296.83,1122.63 292.54,1126.93 260.45,1126.93 249.49,1137.89 249.49,1486.93 257.17,1494.61 426.23,1494.61 474.58,1542.97
VDD33 on Layer 2 "VDD33" (solid, remove dead copper, pour order 8): 3029.88,1605.14 3033.27,1608.52 3065.09,1608.52 3069.59,1604.02 3069.59,1545.53 3061.43,1536.22 3061.43,1295.01 2997.2,1230.78 2997.2,1154.65 2976.98,1134.43 2851.89,1134.43 2746.16,1028.7 2281.49,1028.7 2262.82,1047.37 2262.82,1316.32 2264.43,1323.04 2308.45,1323.04 2312.12,1319.37 2312.12,1127.73 2369.84,1070.01 2729.07,1070.01 2828.81,1169.76 2921.7,1169.76 2952.39,1200.45 2952.39,1221.16 3029.88,1298.66
VDDK on Layer 2 "VDDK" (solid, remove dead copper, pour order 7): 2233.94,1316.41 2253.26,1335.73 2253.26,1362 2244.2,1371.05 2216.43,1371.51 2017.01,1371.51 2016.54,1371.04 2010.45,1377.13 2010.45,1698.96 2013.93,1702.44 2220.88,1702.44 2227.84,1695.48 2227.84,1669.1 2215.95,1657.21 2057.86,1657.21 2054.92,1654.27 2054.92,1412.73 2062.1,1405.55 2248.73,1405.55 2277.11,1377.17 2277.11,1332.41 2261.34,1316.11 2261.34,1037.74 2276.53,1022.56 2748.06,1022.56 2855.78,1130.28 3185.78,1130.28 3205.89,1150.38 3205.89,1445.38 3199.84,1451.43 3157.08,1451.43 3153.89,1454.61 3153.89,1491.46 3158.1,1495.67 3236.94,1495.67 3239.97,1492.63 3239.97,1101.05 3235.46,1096.53 2876.24,1096.53 2842.6,1062.89 2842.6,989.25 2833.72,980.36 2238.61,980.36 2233.94,985.04
VDDIO on Layer 2 "VDDIO" (solid, remove dead copper, pour order 24): 2599.9,1810.07 2824.18,1810 2825.2,1810 2825.4,1809.81 2826.32,1810.73 2826.32,1862.31 2828.86,1864.85 2961.96,1864.85 2965.01,1861.16 2965.01,1807.96 2966.54,1806.43 2987.33,1806.43 2987.42,1806.34 2991.42,1810.34 2991.42,1911.71 2987.52,1915.62 2751.48,1915.62 2750.08,1914.22 2750.08,1848.66 2748.96,1847.54 2598.01,1847.54 2590.38,1855.17 2590.38,1922.96 2586.13,1926.58 2512.37,1926.58 2507.62,1921.83 2507.62,1762.15 2420.66,1675.19 2361.86,1675.19 2306.12,1619.45 2306.12,1422.98 2367.75,1361.35 2367.75,1312.38 2370.14,1309.99 2590.75,1309.99 2597.76,1302.98 2597.76,1221.58 2600.24,1219.1 2814.3,1219.1 2848.92,1253.72 2950.59,1253.72 2994.8,1297.94 2994.85,1337.44 2991.21,1341.08 2950.21,1341.08 2949.48,1340.35 2949.48,1326.03 2945.11,1321.67 2636.93,1321.67 2607.17,1352.68 2418.6,1352.68 2414.17,1357.12 2414.17,1397 2343.31,1467.86 2343.31,1602.96 2384,1643.65 2433.49,1643.65
VIO_1.8 on Layer 2 "VIO_1.8" (solid, remove dead copper, pour order 22): 2298.04,1622.77 2298.04,1568.02 2295.69,1565.67 2217.68,1565.67 2215.32,1563.14 2215.36,1456.1 2222.96,1448.5 2267.32,1448.5 2359.2,1356.62 2359.2,1267.03 2367.09,1259.14 2551.28,1259.14 2553.75,1256.67 2553.75,1230.4 2550.21,1226.86 2328.4,1226.86 2320.06,1235.21 2320.06,1323.56 2313.19,1330.42 2288.09,1330.42 2287.19,1331.52 2287.19,1382.03 2256.45,1412.77 2182.62,1412.77 2177.48,1417.91 2177.48,1578.13 2195.84,1596.49 2223.56,1596.49 2343.15,1716.09 2408.04,1716.09 2453.31,1761.36 2453.31,1932.54 2443.52,1942.33 2416.46,1942.33 2414.04,1944.75 2414.04,1985.15 2415.65,1986.62 2494,1986.62 2498.74,1981.88 2498.74,1764.66 2413.52,1679.45 2354.72,1679.45
3V3 on Layer 2 "3V3" (solid, remove dead copper, pour order 19): 846.51,1043.54 850.53,1047.56 990.73,1047.56 990.9,1047.74 992.99,1045.66 992.99,823.71 989.63,820.35 940.43,820.35 937.33,823.45 937.33,962.54 931.78,968.09 849.55,968.09 846.51,971.14
VBUS_CC on Layer 2 "VBUS_CC" (solid, remove dead copper, pour order 17): 1417.65,399.13 1414.9,396.38 1414.9,324.87 1422.56,317.21 1747.54,317.21 1750.61,320.28 1750.61,393 1744.48,399.13
VBUS_FS on Layer 2 "VBUS_FS" (solid, remove dead copper, pour order 16): 231.47,858.94 300.38,858.94 436.1,723.22 785.74,723.22 905.55,603.41 1843.05,603.41 1866.41,626.77 1866.41,721.62 1864.81,723.22 1610.6,723.22 1568.54,681.17 941.34,681.17 796,826.52 462.76,826.52 350.86,938.43 231.53,938.43 222.3,929.2 222.3,865.95
VBUS_5V on Layer 2 "VBUS_5V" (solid, remove dead copper, pour order 15): 1782.08,594.36 2258.33,594.36 2328.25,522.92 2411.82,438.91 2640.88,438.91 2698.53,381.25 2834.48,381.25 2835.06,380.68 2844.89,390.51 2844.89,567.81 2852.39,575.3 2915.34,575.3 2926.26,564.37 2926.26,285.56 2900.21,259.51 2644.27,259.51 2565.45,338.32 2311.06,338.32 2140.81,508.58 783.34,508.58 778.67,513.24 778.3,619.75 771.85,626.2 433.48,626.2 413.92,606.63 413.92,564.57 408.52,559.17 222.49,559.17 216.75,563.76 216.75,626.2 229.16,638.61 292.82,638.61 310.39,656.18 310.39,705.74 315.36,710.71 786.68,710.71 903.04,594.36
LDO_3V3 on Layer 2 "LDO_3V3" (solid, remove dead copper, pour order 14): 769.53,613.43 762.5,620.46 694.44,620.46 691.29,617.31 691.29,146.97 696.06,142.21 1082.44,142.21 1093.06,131.59 1093.06,63.54 1097.75,60.28 1173.58,60.28 1176.48,63.18 1176.48,199.4 1147.18,228.69 791.63,228.69 769.53,250.79
5V on Layer 2 "5V" (solid, remove dead copper, pour order 13): 2008.7,301.77 2008.7,431.68 2016.71,439.69 2075.05,439.69 2078.22,436.52 2078.22,324.95 2083.91,319.75 2544.92,319.75 2639.14,225.52 3271.58,225.52 3341.94,155.16 4483.09,155.16 4494.79,166.86 4494.79,1261.12 4499.4,1265.73 4585.79,1265.73 4592.04,1259.48 4592.04,75.07 4563.83,46.86 3211.64,46.86 3157.62,100.88 2598.47,100.88 2469.15,230.2 2150.73,230.2 2068.38,147.84 1241.75,147.84 1151.02,238.57 861.43,238.57 855.35,244.65 855.35,486.37 862.73,493.75 934.09,493.75 939.59,488.05 939.59,317.52 947.59,309.52 1209.21,309.52 1307.02,211.71 1918.64,211.71
VIO_1.8 on Layer 2 "VIO_1.8" (solid, remove dead copper, pour order 9): 1678.04,814.87 1687.19,824.02 1687.19,885.04 1693.2,891.04 1729.24,891.04 1732.11,893.89 1732.11,1833.09 1739.6,1841.19 1872.56,1841.19 2016.34,1984.97 2200.74,1984.97 2203.88,1987.53 2203.88,2064.09 2198.47,2069.51 1941.57,2069.51 1824.09,1952.02 1546.6,1952.02 1541.58,1947.06 1541.58,966.94 1392.95,818.31 1132.57,818.31 1121.73,829.14 1121.73,1171.43 1128.58,1178.28 1181.4,1178.28 1203.9,1155.78 1274.67,1155.78 1303.87,1184.99 1303.87,1417.62 1283.55,1437.95 1131.89,1437.95 1127.03,1433.09 1127.03,1367.19 1131.11,1363.11 1229.57,1363.11 1238.09,1354.59 1238.09,1232.78 1228.92,1223.61 1082.62,1223.61 1077.64,1218.62 1077.64,769.82 1081.47,765.98 1478.13,765.98 1527.02,814.87
1V2 on Layer 2 "1V2" (solid, remove dead copper, pour order 6): 2852.67,811.01 2846.1,806.55 1532.35,806.55 1477.92,752.12 1068.73,752.12 1065.14,755.71 1065.14,806.22 1062.2,809.7 935.86,809.7 927.49,818.08 927.49,839.36 924.4,842.45 921.26,845.6 869.38,845.6 866.91,843.13 866.91,765.69 943.39,689.21 1576.58,689.21 1613.37,726 3301.49,726 3326.16,750.67 3322.44,1496.47 3321.52,1497.38 3249.84,1497.38 3247.15,1494.69 3247.15,1099.1 3237.8,1089.74 2892.79,1089.74 2879.47,1076.42 2862.01,1075.85 2852.67,1066.52
GND on Bottom Layer "GND-L4" (solid, remove dead copper, pour order 28): -1.31,3346.14 -1.31,-1.76 4932.82,-1.76 4932.82,3351.8 4926.4,3351.8
3V3 on Bottom Layer "3V3" (solid, remove dead copper, pour order 25): 2259.65,1976.04 2294.17,1976.04 2318.86,2000.73 2318.86,2044.77 2376.86,2102.81 2723.8,2102.81 2810.52,2016.08 2914.67,2016.08 2921.59,2009.16 2921.59,1989.06 2918.62,1986.09 2792.73,1986.09 2710.53,2068.28 2393.04,2068.28 2380.63,2055.87 2380.63,1928.62 2367.48,1915.48 2263.83,1915.48 2258.45,1920.86 2258.45,1973.73
VDDIO on Bottom Layer "VDDIO" (solid, remove dead copper, pour order 23): 2386.68,2059.02 2384.83,2057.17 2384.83,2029.1 2384.55,2028.82 2385.4,2027.97 2519.22,2027.97 2525.08,2022.11 2525.08,1887.26 2530.37,1881.97 2592.2,1881.97 2596.26,1886.03 2596.26,1920.07 2594.08,1922.26 2562.85,1922.26 2559.1,1926 2559.1,2055.53 2555.62,2059.02
VIO_1.8 on Bottom Layer "VIO_1.8" (solid, remove dead copper, pour order 21): 3040.26,1983.1 3040.3,1983.05 3044.25,1987 3044.25,2029.19 3046.22,2031.16 3083.11,2031.16 3085.7,2028.58 3085.7,1959.61 3079.9,1953.82 2780.61,1953.82 2721.43,2013 2657.96,2013 2648.71,2003.74 2648.71,1823.26 2639.98,1814.53 2368.15,1814.53 2355.47,1827.21 2249.96,1827.21 2202.04,1875.13 2202.04,1987.49 2170.53,2019 2170.53,2068.89 2173.01,2071.11 2242.86,2071.11 2249.22,2064.76 2249.22,1874.59 2257.33,1866.48 2437.89,1866.48 2446.41,1875 2446.41,1935.4 2439.77,1942.04 2420.52,1942.04 2416.54,1946.02 2416.54,1986.52 2418.53,1988.51 2502.98,1988.51 2506,1985.49 2506,1853.62 2510.82,1848.8 2610.03,1848.8 2617.83,1856.61 2617.83,2055.34 2618.81,2056.32 2722.57,2056.32 2795.79,1983.1
3V3 on Bottom Layer "3V3" (solid, remove dead copper, pour order 18): 900,1000.1 830.6,1000.1 826.9,1003.8 826.9,1577.65 831.43,1582.17 901.53,1582.17 903.53,1579.91 903.53,1003.63
3V3 on Bottom Layer "3V3" (solid, remove dead copper, pour order 20): 938.83,876.21 1002.95,876.21 1005.3,873.86 1005.3,685.1 851.74,531.54 851.74,271.78 862.14,261.38 1064.38,261.38 1069.09,256.67 1069.09,80.55 1056.46,67.92 998.12,67.92 995.51,70.54 995.51,159.8 985.93,169.38 780.15,169.38 769.05,180.48 769.05,560.99 936.41,728.35 936.41,872.77
Link_5V on Bottom Layer "Link_5V" (solid, remove dead copper, pour order 11): 219.76,1085.28 219.76,1011.05 224.75,1006.06 321.97,1006.06 329.85,998.18 329.85,743.98 318.99,733.12 226.04,733.12 219.65,727.53 219.65,656.34 224.61,651.38 415.82,651.38 441.48,677.04 441.48,1083.46 434.86,1090.09 224.57,1090.09
GND on Layer 1 "GND" (solid, remove dead copper, pour order 0): -12.82,3362.66 -12.82,-8.02 4924.98,-8.02 4924.98,3355.75

## Keep-outs
Keep-Out Layer:
  the board outline again, w10

## Other copper
Top Layer:
  rectangle net GND: 3941.52,1733.78 4072.08,1956.03
  rectangle net GND: 3944.63,2026.75 4071.3,2255.22
  rectangle net VBUS_FS: 1755.66,599.87 1933.48,687.63
  region net 5V: 568.11,1979.14 565.06,1982.19 565.06,2054.65 572.48,2062.07 675.49,2062.07 680.73,2056.84 680.73,1986.56 673.31,1979.14
  pour cut-out: 614.49,996.17 614.49,848.57 769.28,848.57 769.28,996.17
  pour cut-out: 1117.22,506.29 1117.22,347.65 1273.46,347.65 1273.46,505.2
  pour cut-out: 2402.86,1797.23 2846.86,1797.23 2846.86,1354.69 2401.82,1354.69
  pour cut-out: 2852.15,1502.06 3400.01,1502.06 3586.28,1315.79 3586.28,600.29 3653.02,533.55 3925.16,533.55 4008.86,617.25 4008.86,923.42 3988.97,943.31 3861.32,943.31 3855.29,949.34 3855.29,1549.97 3788.06,1617.2 3187.29,1617.2 3132.1,1562.01 2844.29,1562.01 2839.83,1557.56 2839.83,1505.37
  pour cut-out: 2703.84,985.95 2734.06,955.73 2734.06,474.64 2782.45,426.25 3209.56,426.25 3246.11,462.8 3246.11,844.23 2952.8,1137.54 2952.8,1227.21 2925.98,1254.03 2869.01,1254.03 2834.49,1288.54 2834.49,1342.16 2826.74,1349.92 2711.52,1349.92 2705.82,1344.22
  region net DC_3V3: 1167.64,402.95 1167.64,278.23 1160.98,271.57 944.84,271.57 940.61,267.34 940.61,216.48 895.8,171.68 895.8,69.36 901.25,63.91 961.8,63.91 972.69,74.81 972.69,151.09 972.09,151.7 1028.39,208 1215.47,208 1240.29,232.83 1240.29,401.74
  region net 5V_IN: 719.49,239.85 418.36,239.85 405.11,226.6 405.11,66.88 413.31,58.67 479.6,58.67 483.39,62.46 483.39,147.05 498.54,162.2 720.76,162.2 725.18,166.62 725.18,234.17
  region net PIN_5V: 230.05,532.54 313.05,532.54 321.22,524.36 321.22,359.62 331.29,349.56 658.32,349.56 664.49,343.39 664.49,280.37 660.22,276.11 229.51,276.11 220.51,285.11 220.51,527.71
  region net VBUS_CC: 1937.01,466.82 1941.61,471.42 1941.61,567.58 1937.66,572.01 1729.03,572.01 1697.15,540.13 1697.15,411.54 1675.97,390.36 1675.97,288.28 1697.15,288.86 1697.15,347.09 1704.08,354.03 1740.51,354.03 1785.2,398.72 1785.2,462.28 1789.73,466.82
  region net VBUS_CC: 1505.59,395.84 1503.5,397.92 1433.65,397.92 1430.41,394.68 1430.41,349.84 1431.36,348.89 1477.82,348.89 1481.73,344.98 1481.73,274.66 1503.99,274.35 1505.59,275.95
  region net LDO_3V3: 736.3,723.92 736.3,682.36 747.11,671.54 747.11,631.6 765.53,613.19 765.53,562.36 762.93,559.76 711.32,559.76 707.69,563.39 707.69,670.25 712.2,674.75 712.2,724.28 713.34,725.42 734.79,725.42
  region net Link_5V: 355.9,2604.16 355.9,2617.41 361.41,2622.93 398.7,2622.93 400.77,2620.87 400.77,2566.22 397.39,2562.85 355.24,2562.85 347.75,2570.34 289.49,2570.34 288.36,2589.45 291.92,2593.01 344.75,2593.01
  region net Link_5V: 280.37,2378.1 346.97,2378.1 352.76,2372.31 352.76,2351.37 355.42,2348.71 397.55,2348.71 401.45,2352.61 401.45,2398.89 396.7,2403.64 345.69,2403.64 342.61,2400.56 280.5,2400.56
  region net VIO_1.8: 1020.66,764.55 1204.24,764.55 1206.86,767.17 1206.86,788.84 1118.52,788.84 1116.62,790.74 1116.62,802.31 1113.68,805.25 1020.12,805.25 1017.34,802.47 1017.34,767.69
  region net 1V2: 739.57,898.89 852.99,898.89 862.45,889.43 862.45,741.63 850.12,729.3 752.59,729.3 750.91,727.62 750.91,688.95 754.95,684.91 918.73,684.91 929.83,696.01 929.83,943.87 919.07,954.63 742.17,954.63
Layer 1:
  rectangle net GND: 2474.46,1422.99 2771.64,1724.22
Layer 2:
  region net GND: 2439.26,1635.01 2528.88,1724.62 2764.95,1724.62 2789.96,1699.61 2789.96,1441.77 2770.31,1422.12 2489.24,1422.12 2433.49,1477.86 2433.49,1632.62
Bottom Layer:
  region net GND: 2458.16,1709.72 2730.11,1709.72 2755.85,1683.98 2755.85,1445.41 2746.81,1436.37 2469.29,1436.37 2441.47,1464.19 2441.47,1696.5

## Silkscreen, mask and mechanical layers (free items; w line width, h text height)
Top Overlay:
  region: 1786.17,3037.78 1838.21,3016.59 1787.33,2993.67 1796.95,3015.19
  region: 1264.57,3269.88 1316.61,3248.69 1265.74,3225.77 1275.36,3247.28
  region: 2828.2,3055.77 2880.24,3034.58 2829.37,3011.67 2838.99,3033.18
  region: 2828.2,3267.53 2880.24,3246.34 2829.37,3223.43 2838.99,3244.94
  lines w6: 863.66,338.06 863.66,216.85 1064.8,216.85 ; 1834.89,2938.92 2177.73,2938.92 ; 2900.83,2906.22 3796.95,2906.22 ; 3063.76,1849.75 3063.76,1992.72 3098.1,1992.72 ; 3181.61,1633.8 3169.62,1633.8 3169.62,1469.95 3183.62,1469.95
  text "LINK_RST" at 423.45,3225.09 h35
  text "MCU_RST" at 944.43,3225.09 h35
  text "LINK_RST" at 1844.21,3224.55 h35 r270
  text "PIOC_IO0" at 2377.29,3178.49 h35 r270
  text "HSADC" at 2486.2,3178.49 h35 r270
  text "GND" at 2589.28,3178.49 h35 r270
  text "GND" at 1971.56,3127.35 h35
  text "LK_RST" at 2096.63,3121.52 h35
  text "LINK_RX" at 458.44,3112.58 h35
  text "MCU_TX" at 944.43,3112.58 h35
  text "3V3" at 2924.95,3089.05 h35 r270
  text "VSYNC" at 3024.93,3089.05 h35 r270
  text "HSYNC" at 3124.91,3089.05 h35 r270
  text "RESET" at 3224.89,3089.05 h35 r270
  text "D1" at 3324.87,3089.05 h35 r270
  text "D3" at 3424.85,3089.05 h35 r270
  text "D5" at 3524.83,3089.05 h35 r270
  text "D7" at 3624.81,3089.05 h35 r270
  text "LINK" at 2147.03,3084.59 h35 r270
  text "TDO" at 1974.31,3055.44 h35 r270
  text "_TX" at 2037.45,3055.44 h35 r270
  text "_RX" at 2099.12,3055.44 h35 r270
  text "TDI" at 1911.17,3043.77 h35 r270
  text "PC13" at 4596.33,2975.64 h35
  text "KEY" at 4770.64,2975.64 h35
  text "5V" at 1848.02,2932.3 h35 r270
  text "3V3" at 1914.13,2932.3 h35 r270
  text "GND" at 1980.23,2932.3 h35 r270
  text "SWDIO" at 2046.34,2932.3 h35 r270
  text "SWCLK" at 2112.44,2932.3 h35 r270
  text "GND" at 2924.95,2888.92 h35 r270
  text "SCL" at 3024.93,2888.92 h35 r270
  text "SDA" at 3124.91,2888.92 h35 r270
  text "D0" at 3224.89,2888.92 h35 r270
  text "D2" at 3324.87,2888.92 h35 r270
  text "D4" at 3424.85,2888.92 h35 r270
  text "D6" at 3524.83,2888.92 h35 r270
  text "PCLK" at 3624.81,2888.92 h35 r270
  text "PWDN" at 3724.79,2888.92 h35 r270
  text "DOWNLOAD" at 19.98,2688.96 h80
  text "ON" at 54.1,2021.95 h35 r270
  text "OFF" at 54.1,1838.04 h35 r270
  text "SERDES_RXN" at 3481.27,1163.31 h35
  text "SERDES_RXP" at 3481.27,1059.88 h35
  text "SERDES_TXN" at 3481.27,956.44 h35
  text "VBUS_FS" at 308.59,872.83 h35
  text "SERDES_TXP" at 3481.27,853.01 h35
  text "LED1" at 4579.34,791.48 h35
  text "DC_5V" at 308.59,771.64 h35
  text "LINK" at 2273.31,732.08 h35
  text "MCU" at 2616.36,732.08 h35
  text "HS+SS" at 2981.04,714.65 h80
  text "PC12" at 4573.51,688.96 h35
  text "LINK_5V" at 304.9,666.56 h35
  text "CLK" at 2284.41,605.76 h35
  text "CLK" at 2614.26,605.76 h35
  text "PA2" at 4602.67,586.44 h35
  text "VBUS_SS" at 308.59,579.16 h35
  text "PIN_5V" at 306.52,530.53 h35 r270
  text "DIO" at 2284.41,498.71 h35
  text "DIO" at 2614.26,498.71 h35
  text "FS" at 1519.99,490.01 h80
  text "LED0" at 4567.68,483.92 h35
  text "L" at 2195.32,316.98 h35
  text "H" at 2381.6,316.98 h35
  text "CH32H417QEU-R1-1v2" at 4252.01,308.44 h35
  text "5V" at 399.64,166.07 h35
  text "GND" at 496.96,166.07 h35
  text "DC3V3" at 783.23,160.2 h35
  text "3V3" at 974.11,160.2 h35
  text "LDO3V3" at 1093.83,160.2 h35
Bottom Overlay:
  drawing of 285 lines, arcs and shapes, not listed
Top Solder:
  drawing of 3656 lines, arcs and shapes, not listed
  text "https://wch.cn" at 607.68,2587.52 h98.43
Mechanical 1:
  the board outline again, w10

## Text inside footprints (layer, text, board x,y; h text height)
D1: Top Overlay "+" at 1868.64,2731.32 h40 r90
D2: Top Overlay "+" at 1868.64,2661.24 h40 r90
D3: Top Overlay "+" at 456.68,1793.94 h40 r90
P7: Bottom Overlay "V" at 2903.83,421 h31.5 r90; Bottom Overlay "D-" at 2995.83,421 h31.5 r90; Bottom Overlay "D+" at 3075.83,421 h31.5 r90; Bottom Overlay "G" at 3175.83,421 h31.5 r90; Bottom Overlay "R-" at 3193.83,510 h31.5 r90; Bottom Overlay "R+" at 3122.83,510 h31.5 r90; Bottom Overlay "G" at 3040.83,510 h31.5 r90; Bottom Overlay "T-" at 2958.83,510 h31.5 r90; Bottom Overlay "T+" at 2882.83,510 h31.5 r90